# Altium PCB controller.PcbDoc
Units mm, origin at the board's own origin, x right, y up, seen from the top; angles counter-clockwise.
Board outline 63 x 66 mm, 2 copper layers (Top Layer, Bottom Layer); 47 components, 38 nets, 232 pads, 122 vias.
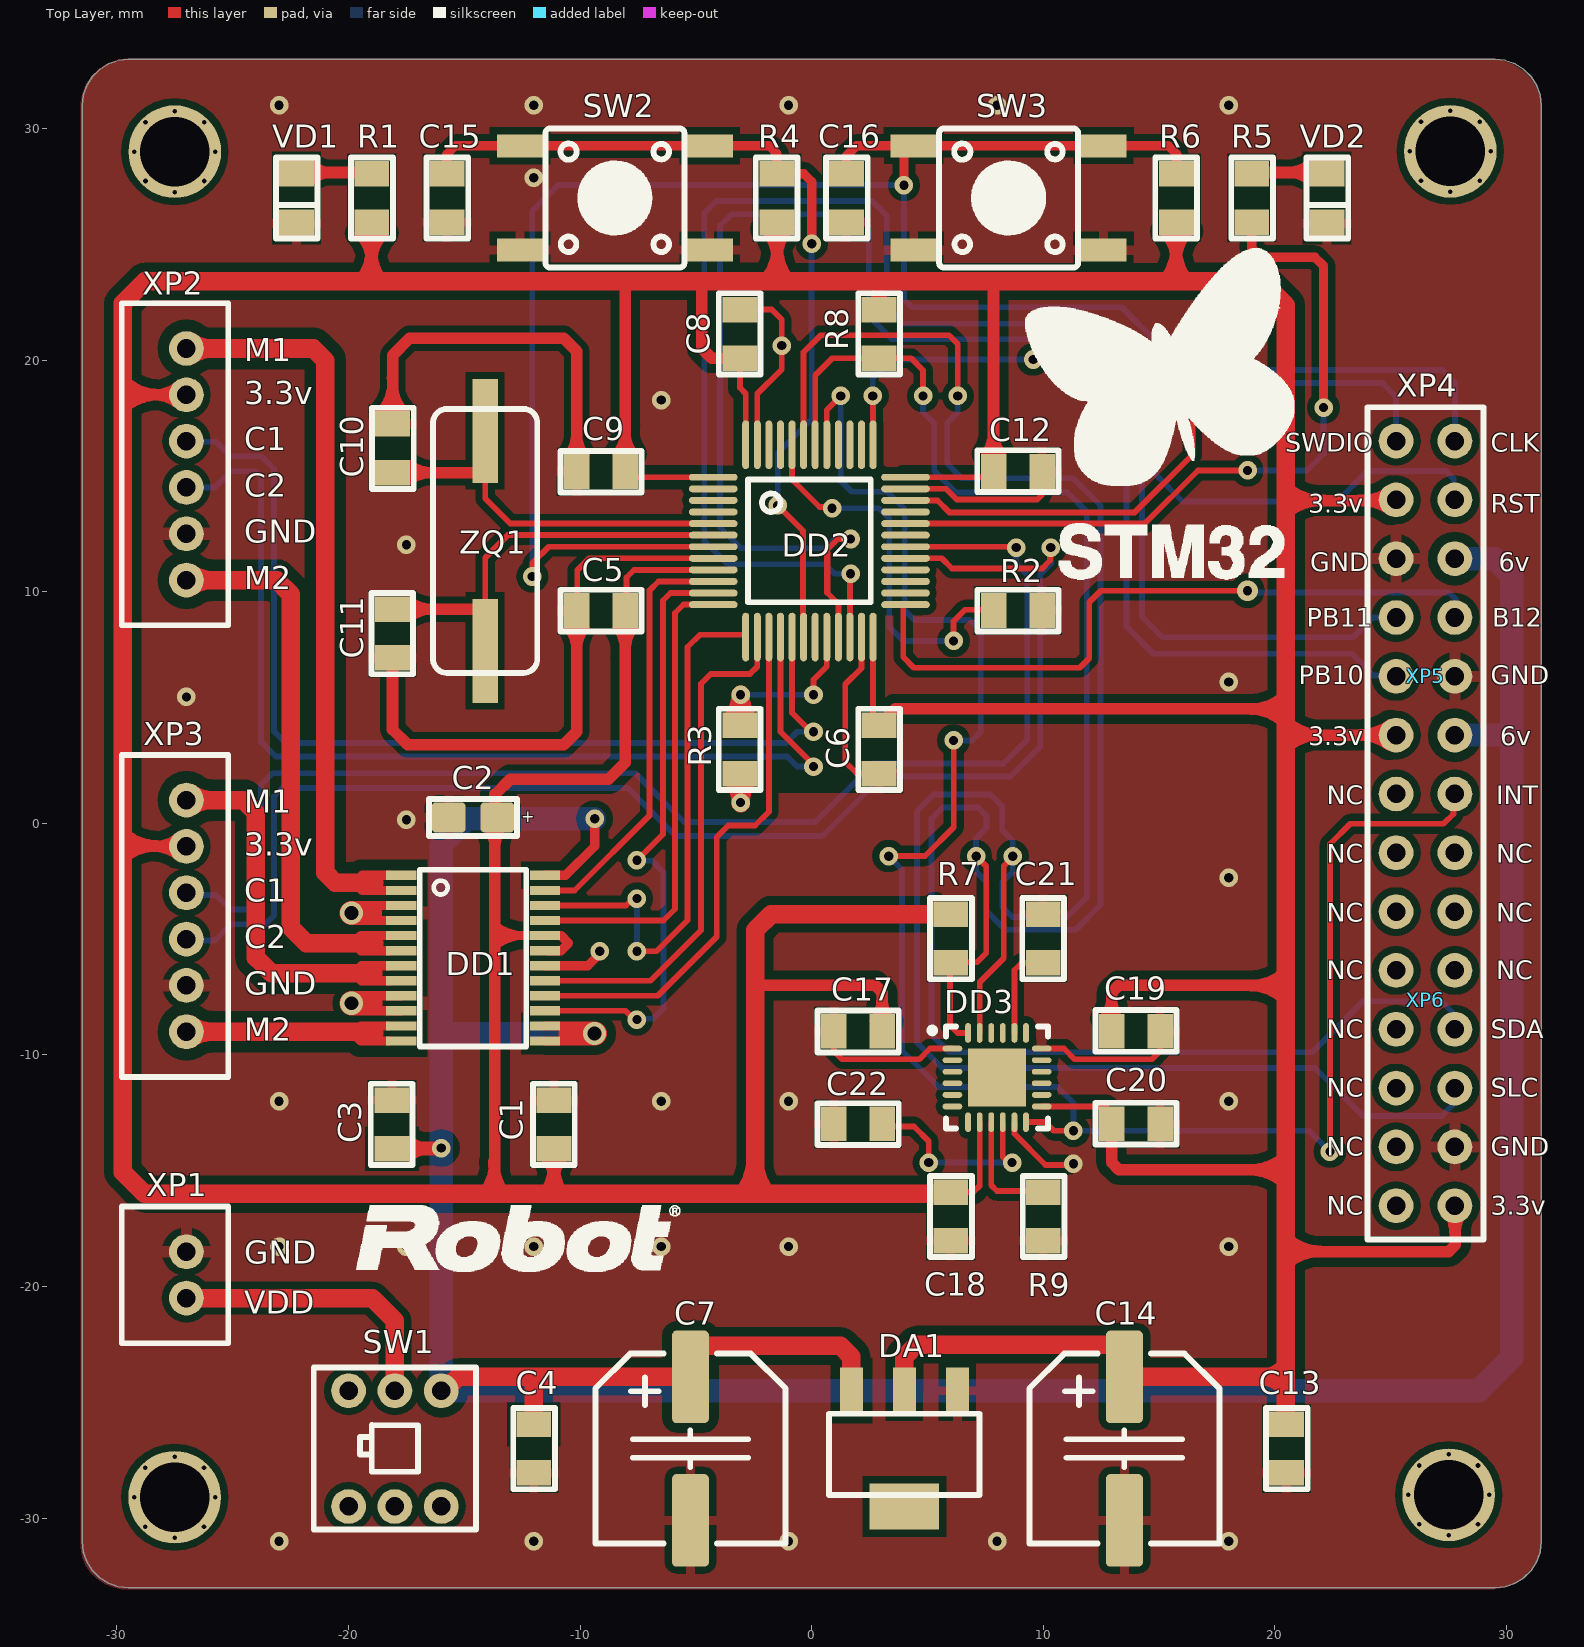
[diagram p0: Top Layer view]
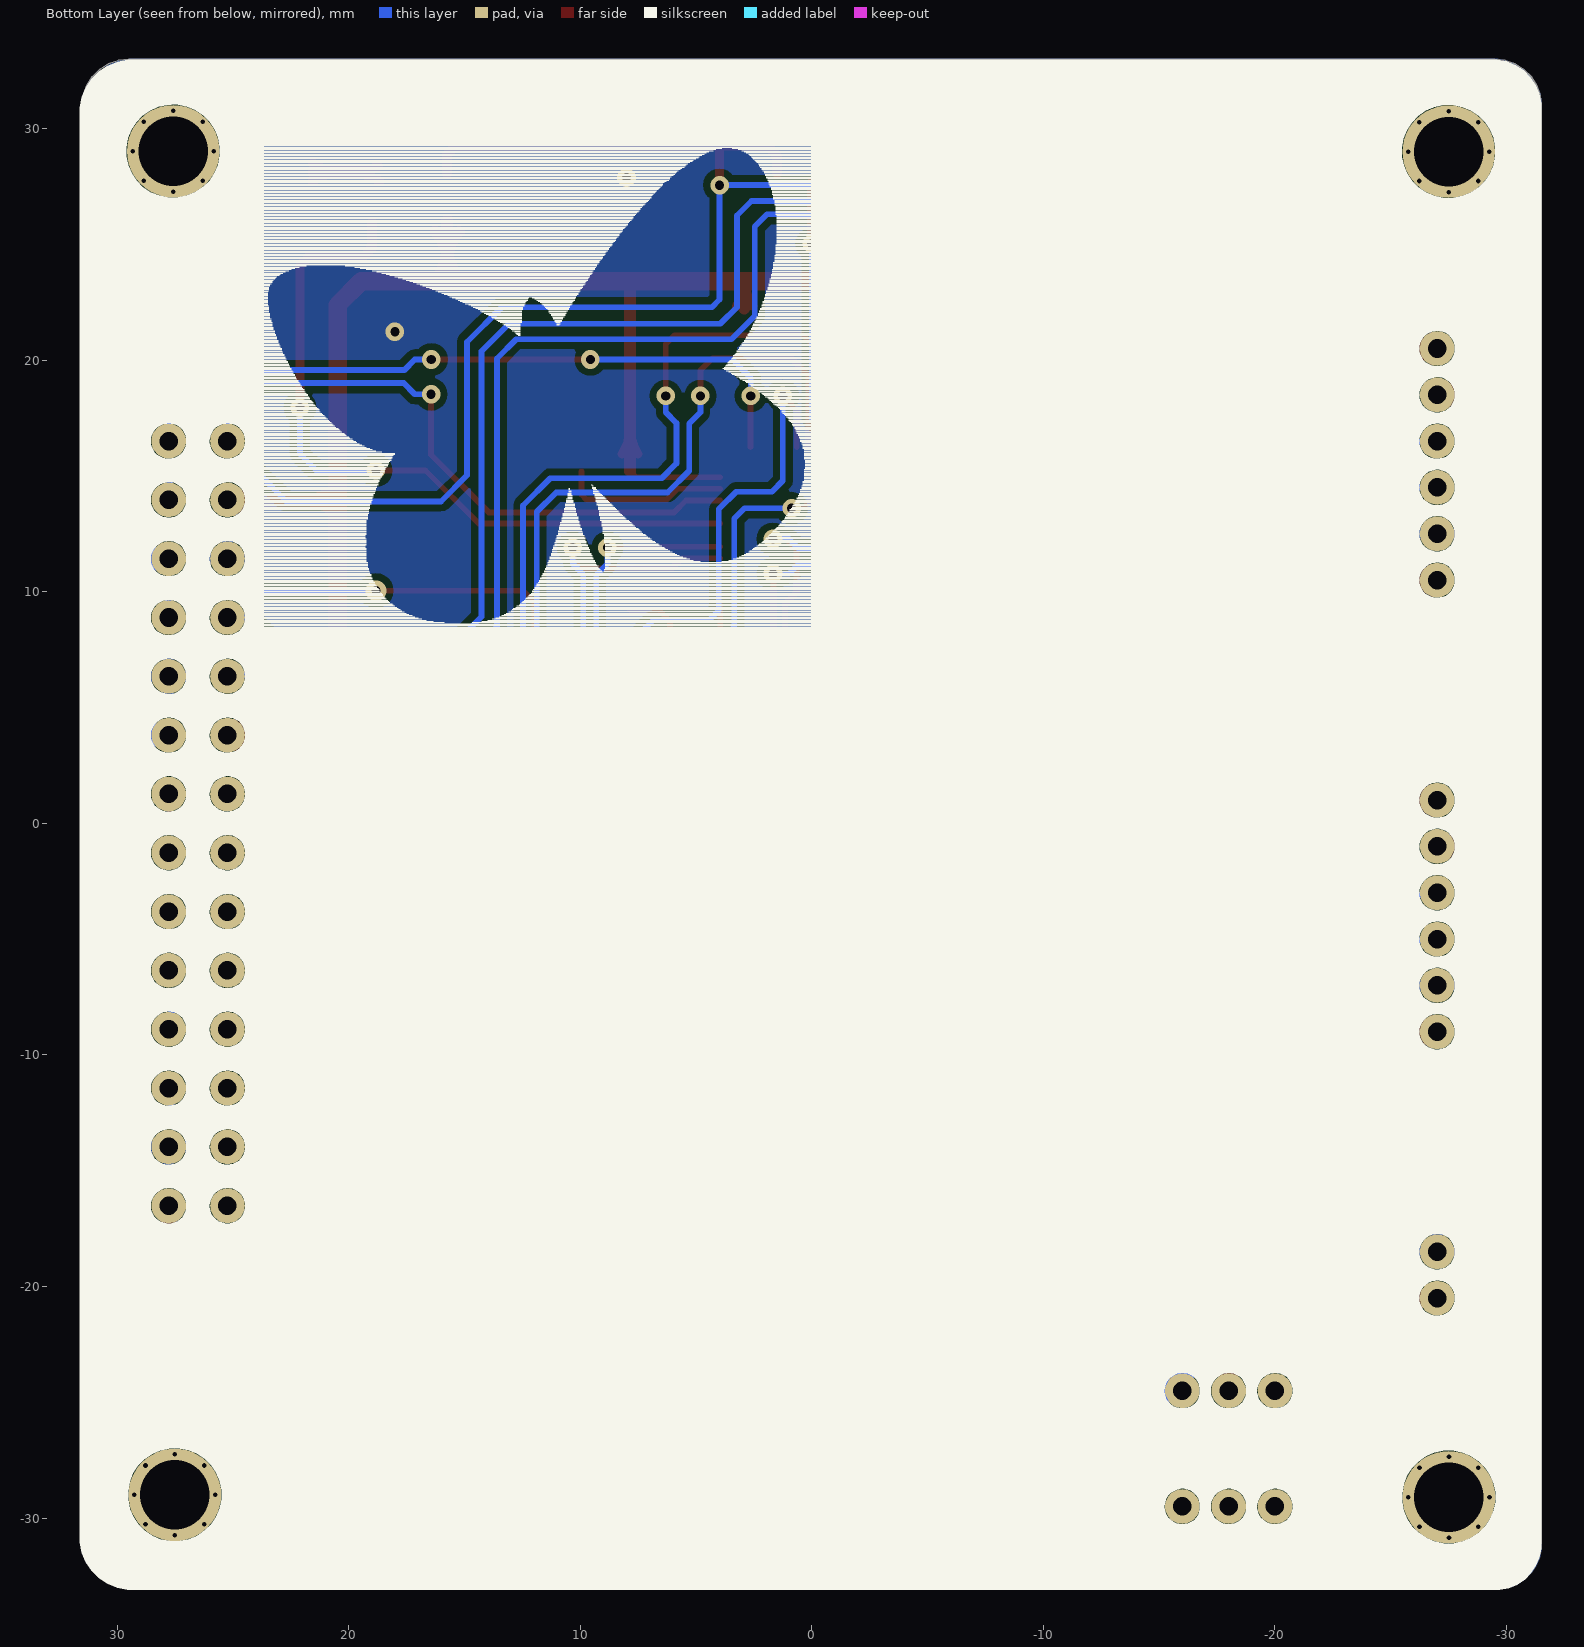
[diagram p1: Bottom Layer view, seen from below]

## Layer stack, top to bottom
Top Solder: solder mask 0.0102, Solder Resist, Dk 3.5
Top Layer: signal copper 0.0356
Dielectric 1: dielectric 0.32, FR-4, Dk 4.8
Bottom Layer: signal copper 0.0356
Bottom Solder: solder mask 0.0102, Solder Resist, Dk 3.5

## Board outline
-31.5,30.987 -31.5,-31.013 -31.45,-31.458 -31.302,-31.881 -31.064,-32.26 -30.747,-32.577 -30.368,-32.815 -29.945,-32.963 -29.5,-33.013 29.5,-33.013 29.945,-32.963 30.368,-32.815 30.747,-32.577 31.064,-32.26 31.302,-31.881 31.45,-31.458 31.5,-31.013 31.5,30.987 31.45,31.432 31.302,31.854 31.064,32.234 30.747,32.55 30.368,32.789 29.945,32.936 29.5,32.987 -29.5,32.987 -29.945,32.936 -30.368,32.789 -30.747,32.55 -31.064,32.234 -31.302,31.854 -31.45,31.432

## Design rules (kind name [scope] priority, off if disabled: settings)
Clearance Clearance_3 [InNet('NetDD1_1') OR InNet('NetDD1_5') OR InNet('NetDD1_7') OR InNet('NetDD1_11')] p1: gap=0.2 ignorepadtopadclearanceinfootprint=FALSE except(0.5: Arc-Fill Arc-Poly Arc-Region Track-Fill Track-Poly Track-Region SMDPad-Fill SMDPad-Poly SMDPad-Region THPad-Fill THPad-Poly THPad-Region Via-Fill Via-Poly Via-Region Fill-Fill Fill-Poly Fill-Region Poly-Poly Poly-Region Region-Region)
Clearance Clearance_2 [All vs InNet('+6')] p2: gap=0.2 ignorepadtopadclearanceinfootprint=FALSE except(0.4: Arc-Fill Arc-Poly Arc-Region Track-Fill Track-Poly Track-Region SMDPad-Fill SMDPad-Poly SMDPad-Region THPad-Fill THPad-Poly THPad-Region Via-Fill Via-Poly Via-Region)
Clearance Clearance_1 [InNet('+3.3')] p3: gap=0.2 ignorepadtopadclearanceinfootprint=FALSE except(0.3: SMDPad-Fill SMDPad-Poly SMDPad-Region THPad-Fill THPad-Poly THPad-Region Via-Fill Via-Poly Via-Region Fill-Fill Fill-Poly Fill-Region Poly-Poly Poly-Region Region-Region; 0.4: Arc-Fill Arc-Poly Arc-Region Track-Fill Track-Poly Track-Region)
Clearance [All] p4: gap=0.2 ignorepadtopadclearanceinfootprint=FALSE except(0.3: Arc-Fill Arc-Poly Arc-Region Track-Fill Track-Poly Track-Region SMDPad-Fill SMDPad-Poly SMDPad-Region THPad-Fill THPad-Poly THPad-Region Via-Fill Via-Poly Via-Region)
ComponentClearance ComponentClearance_1 [InComponent('XP4') AND InComponent('XP5') AND InComponent('XP6') vs InComponent('XP4') AND InComponent('XP5') AND InComponent('XP6')] p1: gap=-10 collisioncheckmode=3 verticalgap=-10 showdistances=FALSE
ComponentClearance [All] p2: gap=-3 collisioncheckmode=3 verticalgap=-3 showdistances=FALSE
DiffPairsRouting [All] p1: maxlimit=0.254 minlimit=0.25 mostfreqgap=0.254 toplayer_minwidth=0.3 toplayer_maxwidth=0.381 toplayer_prefwidth=0.381 bottomlayer_minwidth=0.3 bottomlayer_maxwidth=0.381 bottomlayer_prefwidth=0.381 maxuncoupledlength=12.7
PasteMaskExpansion [All] p1: expansion=0.05
PolygonConnect ConnectVia [InNetClass('via')] p1: thpad.connectstyle=Relief thpad.reliefconductorwidth=0.5 thpad.reliefentries=4 thpad.polygonreliefangle="90 Angle" thpad.airgapwidth=0.3 smdpad.connectstyle=Relief smdpad.reliefconductorwidth=0.4 smdpad.reliefentries=4 smdpad.polygonreliefangle="90 Angle" smdpad.airgapwidth=0.3 via.connectstyle=Direct via.reliefconductorwidth=0.254 via.reliefentries=4 via.polygonreliefangle="90 Angle" via.airgapwidth=0
PolygonConnect [All] p2: connectstyle=Relief reliefconductorwidth=0.5 reliefentries=4 polygonreliefangle="90 Angle" airgapwidth=0.3
RoutingCorners [All] p1: cornerstyle=45-Degree minsetback=0.5 maxsetback=0.5
RoutingVias [All] p1: holewidth=0.4 width=0.9 viastyle="Through Hole" minholewidth=0.4 minwidth=0.8 maxholewidth=0.9 maxwidth=1.5
SolderMaskExpansion [All] p1: expansion=0
Width [All] p1: maxlimit=1.2 minlimit=0.25 preferedwidth=0.3
26 further rules are at their usual default settings.

## Classes and differential pairs
net class via: GND

## Components (designator, comment, footprint, x,y, rotation, side; value= is the part's Value field where it differs from the comment)
C1 "CAPASITOR" CAP0805 -11.125,-13 r90 top value=100nF
C2 "2.2u" CAPMP2012X150USR -14.625,0.251 r180 top
C3 "CAPASITOR" CAP0805 -18.125,-13 r90 top value=100nF
C4 "CAPASITOR" CAP0805 -12,-27 r270 top value=100nF
C5 "CAPASITOR" CAP0805 -9.101,9.191 r180 top value=100nF
C6 "CAPASITOR" CAP0805 2.899,3.191 r270 top value=100nF
C7 "220u" CAP_ELEC_SIZE_E -5.238,-27 r180 top locked
C8 "CAPASITOR" CAP0805 -3.101,21.129 r90 top value=100nF
C9 "CAPASITOR" CAP0805 -9.101,15.191 r180 top value=100nF
C10 "CAPASITOR" CAP0805 -18.101,16.191 r270 top value=22pF
C11 "CAPASITOR" CAP0805 -18.101,8.191 r90 top value=22pF
C12 "CAPASITOR" CAP0805 8.899,15.191 r0 top value=100nF
C13 "CAPASITOR" CAP0805 20.5,-27 r270 top value=100nF
C14 "220u" CAP_ELEC_SIZE_E 13.5,-27 r180 top locked
C15 "CAPASITOR" CAP0805 -15.75,27 r270 top value=100nF
C16 "CAPASITOR" CAP0805 1.5,27 r270 top value=100nF
C17 "CAPASITOR" CAP0805 2,-8.978 r180 top value=100nF
C18 "CAPASITOR" CAP0805 6,-16.978 r270 top value=10uF
C19 "CAPASITOR" CAP0805 14,-8.978 r0 top value=10nF
C20 "CAPASITOR" CAP0805 14,-12.978 r0 top value=100n
C21 "CAPASITOR" CAP0805 10,-4.978 r90 top value=100nF
C22 "CAPASITOR" CAP0805 2,-12.978 r180 top value=100nF
DA1 "AMS1117" SOT-223 4,-27 r180 top locked
DD1 "TB6612FNG" SSOP24 -14.625,-5.824 r0 top
DD2 "STM32F103C8T6" LQFP48_M -0.101,12.191 r0 top
DD3 "MPU6050" QFN24 8,-10.978 r0 top
R1 "RESISTOR" RES0805 -19,27 r270 top value=4.7k
R2 "RESISTOR" RES0805 8.899,9.191 r180 top value=4.7k
R3 "RESISTOR" RES0805 -3.101,3.191 r90 top value=4.7k
R4 "RESISTOR" RES0805 -1.5,27 r90 top value=4.7k
R5 "RESISTOR" RES0805 19,27 r270 top value=4.7k
R6 "RESISTOR" RES0805 15.75,27 r90 top value=4.7k
R7 "RESISTOR" RES0805 6,-4.978 r270 top value=4.7k
R8 "RESISTOR" RES0805 2.899,21.129 r270 top value=4.7k
R9 "RESISTOR" RES0805 10,-16.978 r270 top value=4.7k
SW1 "PS700L" PS700L -18,-27 r0 top locked
SW2 "SWITCH" KLS76x6x4.3 -8.5,27 r0 top
SW3 "SWITCH" KLS76x6x4.3 8.5,27 r0 top
VD1 "RED" LED0805 -22.25,27 r270 top
VD2 "RED" LED0805 22.25,27 r270 top
XP1 "PH2.0-2P" PH2.0-2P -27,-19.5 r90 top locked
XP2 "PH2.0-6P" PH2.0-6P -27,15.5 r90 top
XP3 "PH2.0-6P" PH2.0-6P -27,-4 r90 top locked
XP4 "PLS-2-3" PBD2-3 26.5,13.965 r90 top
XP5 "PLS-2-3_1" PBD2-3 26.5,6.345 r90 top
XP6 "MPU6050" PBD2-16 26.5,-7.625 r90 top
ZQ1 "8MHz" HC-49SM -14.101,12.191 r270 top

## Footprints (in the part's own frame and the unit in brackets; to place one, negate y for a bottom-side part, rotate by r counter-clockwise, add the part's x,y. Pads: shape width x height; smd on the part's side, far side on the other; paste and mask are expansions set on the pad)
CAP0805 [mm]
  rect 1.1x1.5 smd: 1(1.05,0) 2(-1.05,0)
  Top Layer pour cut-out: 0.5,1.05 0.5,-1.05 -0.5,-1.05 -0.5,1.05
  silkscreen extent -1.75,-0.89 1.75,0.91, body extent -1,-0.63 1,0.64, height 0.57
CAP_ELEC_SIZE_E [mm] "Capacitor, polarized, aluminum can; 8.0x6.2mm DxH"
  round 0.635 on Mech15: 0(0,0)
  rrect25% 1.6x4 smd: 1(0,-3.1) 2(0,3.1)
  silkscreen extent -4.1,-4.1 4.1,4.1, body extent -4.25,-4.75 4.25,4.75, height 6.5
CAPMP2012X150USR [mm] "Molded body capacitor, Body 2.0x1.2mm, 0805, IPC Medium Density"
  round 0.254 on Mech15: 0(0,0)
  rrect25% 1.45x1.3 smd: 1(-1.05,0) 2(1.05,0)
  Top Layer pour cut-out: -0.4,0.8 0.4,0.8 0.4,-0.8 -0.4,-0.8
  silkscreen extent -1.9,-0.8 1.9,0.8, body extent -1.02,-0.67 1.03,0.68, height 1.5
HC-49SM [mm]
  rect 4.5x1.1 smd: 1(-4.75,0) 2(4.75,0)
  silkscreen extent -5.7,-2.25 5.7,2.25, body extent -6.2,-2.35 6.2,2.35, height 3.9
KLS76x6x4.3 [mm]
  rect 2x1 smd: 1(-4.1,2.25) 1(4.1,2.25) 2(-4.1,-2.25) 2(4.1,-2.25)
  silkscreen extent -3,-3 3,3, body extent -4.5,-3 4.5,3, height 4.3
LED0805 [mm]
  rect 1.2x1.5 smd: 1(-1.1,0) 2(1.1,0)
  Top Layer pour cut-out: 0.5,1.05 0.5,-1.05 -0.5,-1.05 -0.5,1.05
  silkscreen extent -1.75,-0.89 1.75,0.91, body extent -1.05,-0.67 1.05,0.68, height 0.9
LQFP48_M [mm] "QFP, 48-Leads, Body 7x7mm, Pitch 0.5mm, IPC Low Density"
  oval 2.1x0.3 smd: 1(-4.15,2.75) 2(-4.15,2.25) 3(-4.15,1.75) 4(-4.15,1.25) 5(-4.15,0.75) 6(-4.15,0.25) 7(-4.15,-0.25) 8(-4.15,-0.75) 9(-4.15,-1.25) 10(-4.15,-1.75) 11(-4.15,-2.25) 12(-4.15,-2.75) 25(4.15,-2.75) 26(4.15,-2.25) 27(4.15,-1.75) 28(4.15,-1.25) 29(4.15,-0.75) 30(4.15,-0.25) 31(4.15,0.25) 32(4.15,0.75) 33(4.15,1.25) 34(4.15,1.75) 35(4.15,2.25) 36(4.15,2.75)
  oval 0.3x2.1 smd: 13(-2.75,-4.15) 14(-2.25,-4.15) 15(-1.75,-4.15) 16(-1.25,-4.15) 17(-0.75,-4.15) 18(-0.25,-4.15) 19(0.25,-4.15) 20(0.75,-4.15) 21(1.25,-4.15) 22(1.75,-4.15) 23(2.25,-4.15) 24(2.75,-4.15) 37(2.75,4.15) 38(2.25,4.15) 39(1.75,4.15) 40(1.25,4.15) 41(0.75,4.15) 42(0.25,4.15) 43(-0.25,4.15) 44(-0.75,4.15) 45(-1.25,4.15) 46(-1.75,4.15) 47(-2.25,4.15) 48(-2.75,4.15)
  silkscreen extent -2.65,-2.65 2.65,2.65, body extent -4.49,-4.49 4.49,4.49, height 1.6
PBD2-3 [mm]
  round 1.5 hole 0.8: 1(-2.54,-1.27) 2(-2.54,1.27) 3(0,-1.27) 4(0,1.27) 5(2.54,-1.27) 6(2.54,1.27)
  silkscreen extent -4,-2.5 4,2.5, body extent -4.06,-2.54 4.06,2.54, height 8.5
PBD2-16 [mm]
  round 1.5 hole 0.8: 1(-8.89,-1.27) 2(-6.35,-1.27) 3(-3.81,-1.27) 4(-1.27,-1.27) 5(1.27,-1.27) 6(3.81,-1.27) 7(6.35,-1.27) 8(8.89,-1.27) 9(-8.89,1.27) 10(-6.35,1.27) 11(-3.81,1.27) 12(-1.27,1.27) 13(1.27,1.27) 14(3.81,1.27) 15(6.35,1.27) 16(8.89,1.27)
  silkscreen extent -10.35,-2.5 10.35,2.5, body extent -10.09,-2.52 10.23,2.48, height 8.4
PH2.0-2P [mm]
  round 1.5 hole 0.8: 1(-1,0) 2(1,0)
  silkscreen extent -2.95,-1.81 2.95,2.79, body extent -2.82,-1.74 3.08,2.76, height 6
PH2.0-6P [mm]
  round 1.5 hole 0.8: 1(-5,0) 2(-3,0) 3(-1,0) 4(1,0) 5(3,0) 6(5,0)
  silkscreen extent -6.95,-1.81 6.95,2.79, body extent -6.95,-1.76 6.95,2.74, height 6
PS700L [mm]
  round 1.5 hole 0.8: 1(-2,2.5) 2(0,2.5) 3(2,2.5) 4(-2,-2.5) 5(0,-2.5) 6(2,-2.5)
  silkscreen extent -3.5,-3.5 3.5,3.5, body extent -3.5,-3.5 3.5,3.5, height 12
QFN24 [mm] "QFN, 24-Leads, Body 4.00x4.00mm, Pitch 0.50mm, Thermal Pad 2.60x2.60mm, IPC Medium Density"
  oval 0.85x0.25 smd: 1(-1.925,1.25) 2(-1.925,0.75) 3(-1.925,0.25) 4(-1.925,-0.25) 5(-1.925,-0.75) 6(-1.925,-1.25) 13(1.925,-1.25) 14(1.925,-0.75) 15(1.925,-0.25) 16(1.925,0.25) 17(1.925,0.75) 18(1.925,1.25)
  oval 0.25x0.85 smd: 7(-1.25,-1.925) 8(-0.75,-1.925) 9(-0.25,-1.925) 10(0.25,-1.925) 11(0.75,-1.925) 12(1.25,-1.925) 19(1.25,1.925) 20(0.75,1.925) 21(0.25,1.925) 22(-0.25,1.925) 23(-0.75,1.925) 24(-1.25,1.925)
  rect 2.5x2.5 smd: 25(0,0)
  silkscreen extent -2.92,-2.2 2.2,2.2, body extent -2,-2.01 2.01,2, height 0.9
RES0805 [mm]
  rect 1.1x1.5 smd: 1(1.05,0) 2(-1.05,0)
  Top Layer pour cut-out: 0.5,1.05 0.5,-1.05 -0.5,-1.05 -0.5,1.05
  silkscreen extent -1.75,-0.89 1.75,0.91, body extent -1,-0.63 1,0.63, height 0.43
SOT-223 [mm]
  rect 3x2 smd: 0(0,2.5)
  rect 1x2 smd: 1(-2.29,-2.5) 2(0,-2.5) 3(2.29,-2.5)
  silkscreen extent -3.25,-1.5 3.25,2, body extent -3.25,-3.22 3.25,3.78, height 1.85
SSOP24 [mm]
  rect 1.3x0.4 smd: 1(-3.1,3.575) 2(-3.1,2.925) 3(-3.1,2.275) 4(-3.1,1.625) 5(-3.1,0.975) 6(-3.1,0.325) 7(-3.1,-0.325) 8(-3.1,-0.975) 9(-3.1,-1.625) 10(-3.1,-2.275) 11(-3.1,-2.925) 12(-3.1,-3.575) 13(3.1,-3.575) 14(3.1,-2.925) 15(3.1,-2.275) 16(3.1,-1.625) 17(3.1,-0.975) 18(3.1,-0.325) 19(3.1,0.325) 20(3.1,0.975) 21(3.1,1.625) 22(3.1,2.275) 23(3.1,2.925) 24(3.1,3.575)
  silkscreen extent -2.3,-3.81 2.3,3.82, body extent -3.27,-3.95 3.28,3.95, height 1.2

## Part data
C1 C3 C4 C5 C6 C8 C9 C10 C11 C12 C13 C15 C16 C17 C18 C19 C20 C21 C22: "CAP"
C2 C7 C14: library part CAPASITOR_POLAR, "CAP"
DA1: library part AMS1117-3.3
DD1: library part DRIVER-TB6612FNG-O/C8/EL(SSOP24)(ESKD), "Stepping Motor Driver Ic Unipolor Copper Wire 8", Package="SSOP-24 Toshiba", Availability=Unavailable, MF=Toshiba, MP=TB6612FNG_O,C,8,EL, Price=None, SnapEDA_Link=https://www.snapeda.com/parts/TB6612FNG%28O%2CC%2C8%2CEL/Toshiba/view-part/?ref=snap
DD2: I/Os (High Current)=37, Operating Frequency(F) (Processor speed) (MHz)=72, Supplier Part Number 1=497-6063-ND, Supply Voltage(Vcc) min (V)=2, A/D Converter="2x12-bit (10 Channel)", ComponentLink1Description="Manufacturer URL", ComponentLink1URL=http://www.st.com/web/en/home.html, ComponentLink2Description=Datasheet, ComponentLink2URL=http://www.st.com/st-web-ui/static/active/en/resource/technical/document/datasheet/CD00161566.pdf, ComponentLink3Description="Package Specification", ComponentLink3URL=http://www.st.com/st-web-ui/static/active/en/resource/technical/document/datasheet/DM00058181.pdf, Core="ARM Cortex-M3", DatasheetVersion="Rev. 16", FLASH Size (Prog) (kB)=64, Internal RAM Size (kB)=20, Mounting Technology="Surface Mount", PackageDescription="48-Pin Low Profile Quad Flat Package, 7 x 7 mm Body, 0.5 mm Pitch", PackageReference=LQFP48, PackageVersion="Rev. 6, 06/2013", Packing=Tray, PartNumber=STM32F103C8T6, Supplier 1=Digi-Key, Supplier 2=Farnell, Supplier 3=Newark, Supplier 4=Newark, Supplier 5=Mouser, Supplier Part Number 2=1447637, Supplier Part Number 3=59M2182, Supplier Part Number 4=57P1222, Supplier Part Number 5=511-STM32F103C8T6
DD3: library part MPU6050(ESKD)
R1 R2 R3 R4 R5 R6 R7 R8 R9: "*"
VD1 VD2: library part diode_led
XP6: library part PBD-1-8
ZQ1: library part HC-49
SW1: ComponentLink1Description=datasheet, ComponentLink1URL=https://static.chipdip.ru/lib/054/DOC000054735.pdf
SW2 SW3: ComponentLink1Description=AliExpress, ComponentLink1URL=https://ru.aliexpress.com/item/10PCS-4-4-1-6mm-4x4x1-6H-SMD-push-button-switch-microswitch-Tact-Switch/32731081870.html?spm=a2g0s.9042311.0.0.250233edGDnBBV
XP1 XP2 XP3 XP4 XP5: ComponentLink1Description=PH2.0-6P, ComponentLink1URL=https://ru.aliexpress.com/item/PH2-0-Pin-2-0/32959003108.html?spm=a2g0s.13010208.99999999.267.6b9d3c00Fzf6qQ

## Free pads (board coordinates)
  round 4 hole 3: 0(-27.511,-29.099) 0(-27.5,29) 0(27.5,-29) 0(27.574,29.013)

## Via types
v1: diameter 0.8, hole 0.4, Top Layer to Bottom Layer, tented both sides, 70 vias
v2: diameter 0.3, hole 0.2, Top Layer to Bottom Layer, 48 vias
v3: diameter 1, hole 0.6, Top Layer to Bottom Layer, tented both sides, 3 vias
v4: diameter 0.9, hole 0.4, Top Layer to Bottom Layer, tented both sides, 1 vias

## Nets (pads, with @x,y where several pads share a name; then routed paths per layer and width w, separated by ;. In a path a pad name is that pad's centre, name@x,y a point inside that pad or via, vN(x,y) a via of type N, cw(c..) or ccw(c..) an arc to the next point about the centre after c; other vN are vias at no path point)
+3.3: C1.2 C2.1 C5.2 C6.2 C8.2 C9.2 C12.2 C13.2 C14.1 C17.2 C18.2 C19.2 C20.2 DA1.2 DD1.19 DD1.20 DD2.1 DD2.9 DD2.24 DD2.36 DD2.48 DD3.8 DD3.13 R1.1 R4.2 R6.2 R7.2 R8.2 XP2.5 XP3.5 XP4.4 XP5.2 XP6.1 | length 463.6
  Top Layer w0.25: -18.025,23.426 -18,23.4 ; C1.2 -11.125,-14.908 -11.125,-15.875 -11,-16 ; -8.054,23.4 -8.051,23.397 ; C5.2@-8.051,9.191 -8,9.242 -8,10.617 -7.676,10.941 DD2.9@-4.151,10.941 ; C9.2 -7.801,14.941 DD2.1@-4.151,14.941 ; C8.2 -3.101,18.801 -2.851,18.551 DD2.48@-2.851,16.241 ; -2,23.4 -1.975,23.426 ; DD2.24@2.649,8.141 2.649,4.491 C6.2 ; R8.2@2.874,22.179 R8.2@2.914,22.22 ; DD2.36@3.949,14.941 7.599,14.941 C12.2 ; C18.2 6.007,-15.921 6.978,-15.921 7.25,-15.649 DD3.8 ; 7.849,23.249 8,23.4 ; DD3.13 12.705,-12.228 12.95,-12.473 C20.2 ; 14.5,23.4 14.525,23.426 ; 20.477,-19.85 20.486,-19.86 ; 20.477,3.7 20.582,3.805 ; 20.477,11.225 20.677,11.425
  Top Layer w0.4: -28.683,-1.052 cw(c-28.442,-2.78) XP3.5@-27.443,-1.349 ; -28.683,-0.951 ccw(c-28.429,0.739) -28.437,-0.97 ccw(c-28.429,0.739) XP3.5@-27.441,-0.656 ; -28.683,18.448 cw(c-28.442,16.72) XP2.5@-27.443,18.151 ; -28.683,18.549 ccw(c-28.429,20.239) -28.518,18.532 ccw(c-28.429,20.239) XP2.5@-27.441,18.844 ; C2.1@-14.028,-0.13 cw(c-15.423,-1.118) -13.732,-1.371 ; -13.679,-4.849 -12.662,-4.849 ; -13.654,-5.257 cw(c-12.34,-7.042) -12.662,-4.849 ; -13.654,-4.44 ccw(c-12.34,-2.656) -12.662,-4.849 ; -13.632,-1.371 cw(c-11.904,-1.13) C2.1@-13.334,-0.132 ; -12.397,-4.849 -10.825,-4.849 -10.5,-5.174 -10.825,-5.499 DD1.19@-11.4,-5.499 ; DD1.20 -12.662,-4.849 ; C1.2@-11.48,-14.508 cw(c-12.875,-15.495) -11.189,-15.216 cw(c-12.875,-15.495) -11.185,-15.749 ; -11.084,-15.749 cw(c-9.356,-15.508) -11.078,-15.229 cw(c-9.356,-15.508) C1.2@-10.787,-14.509 ; -8.399,15.946 ccw(c-9.829,16.944) -8.102,17.185 ; -8.397,8.438 cw(c-9.792,7.451) -8.102,7.197 ; -8.001,7.197 cw(c-6.273,7.438) -7.704,8.437 ; -8.001,17.185 ccw(c-6.311,16.931) -7.706,15.944 ; -3.074,-15.832 ccw(c-4.858,-14.517) -2.665,-14.839 ; -2.256,-14.815 ccw(c-0.063,-14.493) -1.847,-15.808 ; R8.2@2.55,22.331 ccw(c1.12,23.329) 2.863,23.4 ccw(c1.12,23.329) 2.848,23.57 ; C17.2@2.7,-8.527 ccw(c1.249,-7.558) 2.977,-7.317 ; 2.948,23.57 ccw(c4.639,23.316) 2.932,23.4 ccw(c4.639,23.316) R8.2@3.244,22.329 ; 3.078,-7.309 ccw(c5.186,-7.471) C17.2@3.373,-8.558 ; 4.085,-3.969 cw(c4.326,-5.697) R7.2@5.324,-4.267 ; 4.085,-3.869 ccw(c4.339,-2.178) R7.2@5.326,-3.573 ; 7.501,15.946 ccw(c6.071,16.944) 7.798,17.185 ; 7.899,17.185 ccw(c9.589,16.931) 8.194,15.944
  Top Layer w0.45: R1.1@-19.518,25.477 cw(c-21.064,24.128) -19.039,24.458 ; -18.979,24.377 cw(c-16.942,24.136) R1.1@-18.477,25.496 ; R4.2@-2.02,25.665 cw(c-3.565,24.316) -1.521,24.486 cw(c-3.565,24.316) -1.515,24.235 ; -1.493,24.246 cw(c0.557,24.324) -1.471,24.633 cw(c0.557,24.324) R4.2@-0.979,25.685 ; R6.2@15.222,25.55 cw(c13.676,24.201) 15.707,24.493 ; 15.765,24.486 cw(c17.798,24.209) R6.2@16.263,25.57
  Top Layer w0.5: -29.744,-1 -28.609,-1 ; -29.744,18.5 -28.387,18.5 ; -29.602,-1.408 cw(c-28.287,-3.193) -28.609,-1 ; -29.555,-0.547 ccw(c-28.24,1.237) -28.437,-0.97 ccw(c-28.24,1.237) -28.312,-0.978 ; -29.53,18.075 cw(c-28.215,16.29) -28.387,18.5 ; -29.483,18.936 ccw(c-28.168,20.721) -28.518,18.532 ccw(c-28.168,20.721) -28.24,18.506 ; -28.359,-0.978 ccw(c-28.287,-3.193) -28.609,-1 ; -28.287,18.506 ccw(c-28.215,16.29) -28.387,18.5 ; XP3.5 -28.609,-1 ; XP2.5 -28.387,18.5 ; -19.443,23.497 ccw(c-21.227,24.811) -19.039,24.458 ccw(c-21.227,24.811) -19.012,24.74 ; -19,24.522 R1.1 ; -18.979,24.377 ccw(c-16.797,24.764) -18.581,23.45 ; -14.102,-15.921 ccw(c-15.899,-14.623) -13.706,-14.942 ; -13.724,-14.603 ccw(c-11.508,-14.652) -13.706,-14.942 ; -13.683,-14.601 cw(c-15.899,-14.623) -13.706,-14.942 ; -13.679,-16 -13.679,-15.1 ; -13.679,-5.574 -13.679,-7 ; -13.338,-15.903 cw(c-11.508,-14.652) -13.679,-15.1 ; -11.56,-16.017 ccw(c-13.345,-14.702) -11.548,-16 ccw(c-13.345,-14.702) -11.189,-15.216 ccw(c-13.345,-14.702) -11.13,-14.774 ; -11.13,-14.821 ccw(c-8.914,-14.749) -11.125,-14.908 ccw(c-8.914,-14.749) -11.078,-15.229 ccw(c-8.914,-14.749) -10.744,-16 ccw(c-8.914,-14.749) -10.699,-16.064 ; C5.2 -8.051,2.624 -8.775,1.9 -13.025,1.9 -13.679,1.246 -13.679,-4.849 -13.679,-7 ; C9.2 -8.051,23.397 ; -4.75,23.4 -4.75,20.509 -4.32,20.079 C8.2 ; -2.449,-7 2.74,-7 3.05,-7.31 C17.2 ; -1.913,23.591 ccw(c-3.697,24.905) -1.521,24.486 ccw(c-3.697,24.905) -1.501,24.604 ; -1.557,23.4 ccw(c0.26,24.669) -1.525,23.355 ; -1.501,23.614 -1.501,24.604 ; R4.2@-1.501,26.139 -1.501,24.604 ; -1.482,24.786 ccw(c0.733,24.858) -1.471,24.633 ccw(c0.733,24.858) -1.084,23.589 ; -1.482,24.833 cw(c-3.697,24.905) -1.501,24.604 ; C6.2 3.599,4.941 19.12,4.941 ; R8.2@2.914,22.22 2.914,23.4 ; C12.2 7.849,23.249 ; C19.2@12.652,-8.421 ccw(c11.237,-7.401) 12.947,-7.742 ; C20.2 12.95,-14.646 13.26,-14.956 19.12,-14.956 ; C19.2 12.95,-7.31 13.26,-7 19.12,-7 ; 12.957,-7.734 ccw(c14.66,-7.581) C19.2@13.227,-8.512 ; 15.309,23.564 ccw(c13.524,24.878) 15.707,24.493 ; 15.74,23.499 R6.2@15.74,26.024 ; 15.765,24.486 ccw(c17.955,24.831) 16.17,23.517 ; 18.972,-23.906 cw(c18.901,-26.121) 20.215,-24.336 ; 18.972,-14.962 cw(c18.901,-17.177) 20.215,-15.393 ; 18.972,-7.006 cw(c18.901,-9.221) 20.215,-7.436 ; 18.972,4.935 cw(c18.901,2.72) 20.215,4.505 ; 19.02,-23.906 ccw(c18.948,-21.69) 19.12,-23.9 ccw(c18.948,-21.69) 20.263,-23.475 ; 19.02,-14.962 ccw(c18.948,-12.747) 19.12,-14.956 ; 19.02,-7.006 ccw(c18.948,-4.79) 19.12,-7 ; 19.02,4.935 ccw(c18.948,7.151) 19.12,4.941 ; 20.263,-14.531 cw(c18.948,-12.747) 19.12,-14.956 ; 20.263,-6.575 cw(c18.948,-4.79) 19.12,-7 ; 20.263,5.366 cw(c18.948,7.151) 19.12,4.941 ; 20.43,13.935 20.477,13.935 21.523,13.935 ; 20.477,-14.956 19.12,-14.956 ; 20.477,-7 19.12,-7 ; 20.477,4.941 19.12,4.941 ; 20.582,3.805 21.725,3.805 ; 20.633,3.384 cw(c21.947,1.6) 21.725,3.805 ; 20.65,-18.918 cw(c21.964,-20.702) 21.782,-18.493 ; 20.665,14.381 ccw(c22.022,16.223) 21.699,13.958 ccw(c22.022,16.223) 21.948,13.936 ; 20.669,13.508 cw(c21.983,11.724) 22.126,13.936 ; 20.68,4.246 ccw(c21.994,6.03) 21.923,3.815 ; 20.697,-18.056 ccw(c22.012,-16.272) 21.94,-18.487 ; 20.743,-18.493 21.782,-18.493 ; 21.876,3.815 ccw(c21.947,1.6) 21.725,3.805 ; 21.893,-18.487 ccw(c21.964,-20.702) 21.782,-18.493 ; 22.022,13.935 24.01,13.935 ; 23.639,13.936 24.004,13.936 ; 23.682,3.816 cw(c23.61,1.601) 23.843,3.805 ; 23.729,3.816 ccw(c23.657,6.031) 23.829,3.822 ; 23.897,13.94 ccw(c23.725,16.149) XP4.4@25.039,14.365 ; 24.373,3.805 23.843,3.805 ; XP5.2@24.924,3.385 ccw(c23.61,1.601) 23.843,3.805 ; XP5.2@24.972,4.247 cw(c23.657,6.031) 23.829,3.822 ; XP4.4@24.981,13.53 ccw(c23.667,11.745) 24.01,13.935 ; XP4.4@24.996,13.936 24.004,13.936 ; XP5.2@25.186,3.822 23.829,3.822 ; XP4.4@25.23,13.935 24.01,13.935 ; XP6.1@27.347,-16.46 cw(c25.562,-17.774) 27.768,-17.563 cw(c25.562,-17.774) 27.777,-17.703 ; 27.777,-17.75 cw(c29.992,-17.821) 27.794,-17.539 ; XP6.1@27.794,-16.597 27.794,-17.539 ; XP6.1@28.208,-16.507 ccw(c29.992,-17.821) 27.794,-17.539 ; -13.706,-14.942 ccw(c-11.508,-14.652) -13.679,-15.1 ; -13.679,-15.1 -13.679,-7 ; 21.725,3.805 23.843,3.805 ; 21.782,-18.493 27.505,-18.493 27.794,-18.204 27.794,-17.539 ; 24.004,13.936 cw(c23.667,11.745) 24.01,13.935
  Top Layer w0.8: DA1.2 4,-23.032 4.522,-22.51 13.1,-22.51 13.5,-22.91 C14.1 19.12,-23.9 20.477,-23.9 ; R7.2@5.975,-3.928 -1.753,-3.928 -2.449,-4.624 -2.449,-7 -2.449,-16 ; C18.2@6,-16 -2.449,-16 ; 20.474,-18.541 20.477,-14.956 20.477,-7 20.477,3.7 20.477,4.941 20.477,11.225 20.477,13.935 20.477,22.377 19.453,23.4 14.5,23.4 8,23.4 2.932,23.4 2.914,23.4 2.863,23.4 -1.557,23.4 -2,23.4 -4.75,23.4 -8.054,23.4 -18,23.4 -28.793,23.4 -29.744,22.45 -29.744,18.5 -29.744,-1 -29.744,-15.063 -28.807,-16 -13.679,-16 -11.548,-16 -11,-16 -10.744,-16 -2.449,-16 ; 20.477,-17.925 20.477,-19.85 20.477,-23.9 ; C13.2 20.477,-25.95 20.477,-23.9
+6: C3.2 C4.2 C7.1 DA1.3 DD1.13 DD1.14 DD1.24 SW1.3 XP4.1 XP5.1 | length 158.7
  Top Layer w0.25: v1@-15.9,-14.05 v1@-15.875,-14.025
  Top Layer w0.4: -17.373,-14.396 cw(c-16.385,-15.791) v1@-16.131,-14.1 ; -17.371,-13.702 ccw(c-16.372,-12.272) v1@-16.131,-14 ; DD1.13 -10.313,-9.399 ; DD1.14 -10.313,-8.749 ; DD1.24 -10.635,-2.249 -9.375,-0.989 v1(-9.375,0.198)
  Top Layer w0.6: C3.2 v1@-15.9,-14.05
  Top Layer w0.8: SW1.3 -15.861,-24.5 -15.261,-23.9 -12,-23.9 ; C4.2 -12,-23.9 ; C7.1@-5.638,-23.032 -5.638,-22.51 -5.238,-22.91 C7.1 -12,-23.9 ; C7.1@-5.238,-22.564 1.241,-22.564 1.71,-23.032 DA1.3@1.71,-24 ; DA1.3@1.61,-23.9 DA1.3@1.71,-24 ; DA1.3@1.764,-24.554 DA1.3 DA1.3@1.71,-24
  Top Layer w1.05: -10.419,-9.075 v3(-9.375,-9.075)
  Bottom Layer w0.25: 30.145,3.805 30.225,3.725
  Bottom Layer w1: -15.875,-9.053 -15.853,-9.075 v3(-9.375,-9.075) ; v1(-9.375,0.198) -14.87,0.198 -16,-0.932 v1(-16,-14.025) SW1.3 28.8,-24.5 30.225,-23.075 30.225,3.725 30.225,10.687 29.487,11.425 XP4.1@28.27,11.425 ; XP5.1 30.145,3.805
GND: C1.1 C2.2 C3.1 C4.1 C5.1 C6.1 C7.2 C8.1 C9.1 C10.2 C11.2 C12.1 C13.1 C14.2 C15.1 C16.1 C17.1 C18.1 C19.1 C20.1 C21.1 C22.1 DA1.1 DD1.3 DD1.4 DD1.9 DD1.10 DD1.18 DD2.8 DD2.23 DD2.35 DD2.47 DD3.1 DD3.11 DD3.18 R2.2 R3.2 R9.1 SW2.2 SW3.2 VD1.2 VD2.2 XP1.2 XP2.2 XP3.2 XP4.2 XP5.3 XP6.2 | length 104.6
  Top Layer w0.2: C5.1@-10.151,9.191 C5.1@-10.125,9.217
  Top Layer w0.25: C5.1@-10.125,9.217 -10.125,10.926 -9.61,11.441 DD2.8 DD2.8@-4.151,11.441 ; C8.1 -1.73,22.179 -1.3,21.749 v1(-1.3,20.629) -1.3,19.596 -2.351,18.545 DD2.47 DD2.47@-2.351,16.241 ; v1(-3.076,0.893) -3.076,0.953 R3.2@-3.076,2.141 ; C17.1 0.95,-9.825 1.311,-10.186 4.65,-10.186 5.108,-9.728 DD3.1 ; DD2.23@2.149,8.141 DD2.23 2.149,6.699 1.45,6 1.45,2.65 1.932,2.168 2.872,2.168 C6.1 ; DD2.35@3.949,14.441 DD2.35 5.794,14.441 6.26,13.975 9.733,13.975 9.949,14.191 C12.1 ; DD3.11 8.75,-13.403 10.097,-14.75 v1@11.075,-14.75 ; DD3.18 10.892,-9.728 11.35,-10.186 14.689,-10.186 15.05,-9.825 C19.1
  Top Layer w0.4: -18.937,-8.099 DD1.10 ; -18.937,-7.449 DD1.9 ; -18.937,-4.199 DD1.4 ; -18.937,-3.549 DD1.3 ; C10.2@-18.653,17.753 ccw(c-19.879,18.994) -18.151,19.235 ; -18.05,19.235 ccw(c-16.36,18.981) C10.2@-17.549,17.753 ; DD1.18 -9.671,-6.149 -9.2,-5.678 -9.2,-5.475 v1@-9.15,-5.425 ; C9.1@-10.498,15.895 ccw(c-11.929,16.893) -10.201,17.134 ; -10.497,8.439 cw(c-11.892,7.451) -10.202,7.197 ; -10.101,7.197 cw(c-8.373,7.438) -9.804,8.437 ; -10.1,17.134 ccw(c-8.41,16.881) C9.1@-9.805,15.893 ; R3.2@-3.414,1.935 cw(c-4.809,0.948) -3.365,1.863 cw(c-4.809,0.948) v1@-3.119,0.694 ; v1@-3.018,0.694 cw(c-1.29,0.935) -2.868,1.679 cw(c-1.29,0.935) R3.2@-2.721,1.933
  Top Layer w0.5: C11.2 -18.101,4.049 -17.444,3.391 -10.709,3.391 -10.151,3.949 C5.1@-10.151,9.191 ; C10.2@-18.101,17.191 -18.101,19.954 -18.095,19.96 -18.095,20.215 -17.37,20.941 -10.709,20.941 -10.151,20.383 C9.1@-10.151,15.141
  Top Layer w0.6: C10.2@-18.095,17.323 -18.095,18.143
  Top Layer w0.8: R3.2@-3.398,1.909 cw(c-4.784,0.91) -3.365,1.863 cw(c-4.784,0.91) -3.076,0.953 cw(c-4.784,0.91) v1@-3.075,0.897 ; R3.2@-2.78,1.825 ccw(c-1.331,0.853) -2.868,1.679 ccw(c-1.331,0.853) v1@-3.075,0.897 ; v1@-3.075,0.897 ccw(c-1.331,0.853) -3.076,0.867 ccw(c-4.784,0.91) v1@-3.075,0.897
  Top Layer w1.05: v3(-19.875,-7.773) -19.057,-7.773 ; v3(-19.875,-3.873) -19.085,-3.873
  other v1: -23,-31 -12,-31 -1,-31 8,-31 18,-31 -23,-18.278 -17.5,-18.278 -12,-18.278 -6.5,-18.278 -1,-18.278 18,-18.278 11.3,-14.7 -23,-12 -6.5,-12 -1,-12 18,-12 -9.15,-5.525 18,-2.35 -17.5,0.15 -27,5.455 18,6.1 -17.5,12.022 -6.5,18.275 18,21.225 -12,27.871 8,27.871 -23,31 -12,31 -1,31 8,31 18,31
INT: DD2.41 DD3.12 XP6.8 | length 82.1
  Top Layer w0.25: DD2.41@0.649,16.241 DD2.41 0.649,17.849 v1(1.25,18.45) ; v1(3.32,-1.419) 3.327,-1.412 4.886,-1.412 6.128,-0.17 v1@6.128,3.403 ; DD3.12 10.078,-12.903 10.45,-13.275 v1(11.3,-13.275) ; v1(22.375,-14.175) 22.375,-0.9 23.25,-0.025 27.282,-0.025 27.708,0.401 27.708,0.703 XP6.8@28.27,1.265
  Bottom Layer w0.25: v1(1.25,18.45) 1.25,14.787 1.723,14.314 3.264,14.314 4.013,13.565 4.013,9.192 4.423,8.783 6.84,8.783 7.3,8.322 7.3,3.956 6.921,3.577 v1(6.125,3.577) ; v1(3.32,-1.419) 3.902,-2.001 3.902,-9.814 5.479,-11.391 10.613,-11.391 11.3,-12.078 v1(11.3,-13.275) 21.475,-13.275 v1(22.375,-14.175)
NetC10_1: C10.1 DD2.5 ZQ1.1 | length 19.8
  Top Layer w0.25: ZQ1.1@-14.101,17.191 -14.101,16.838 -14.101,14.021 -13.021,12.941 DD2.5@-4.151,12.941
  Top Layer w0.4: -17.348,14.796 cw(c-16.361,13.401) -16.107,15.091 ; -17.347,15.489 ccw(c-16.348,16.919) -16.107,15.192
  Top Layer w0.5: C10.1 ZQ1.1@-14.526,15.141
NetC11_1: C11.1 DD2.6 ZQ1.2 | length 21.3
  Top Layer w0.25: ZQ1.2@-14.152,7.141 -14.101,7.191 -14.101,9.241 -14.101,11.465 -13.125,12.441 DD2.6@-4.151,12.441
  Top Layer w0.4: -17.349,8.895 cw(c-16.361,7.5) -16.108,9.19 ; -17.347,9.588 ccw(c-16.349,11.019) -16.108,9.291
  Top Layer w0.5: C11.1 ZQ1.2@-14.101,9.241
NetC15_2: C15.2 DD2.18 R4.1 SW2.1 | length 38.5
  Top Layer w0.25: v1(-1.473,13.725) -0.376,12.628 -0.376,8.166 DD2.18@-0.351,8.141
  Top Layer w0.4: C15.2 -15.755,28.055 -15.755,28.886 -15.391,29.25 -12.6,29.25 -4.4,29.25 -1.838,29.25 -1.5,28.912 R4.1 -0.348,28.05 0,27.702 v1(0,25.018)
  Bottom Layer w0.25: v1(-1.473,13.725) -1.473,15.988 -0.011,17.45 ; v1@-0.011,25.018 0,17.45
NetC16_2: C16.2 DD2.7 R6.1 SW3.1 XP4.3 | length 96.2
  Top Layer w0.25: v1(-12.066,10.655) -12.066,11.234 -11.359,11.941 DD2.7@-4.151,11.941 ; SW3.1@3.972,29.25 SW3.1@3.982,29.24
  Top Layer w0.4: C16.2 1.5,28.82 1.93,29.25 3.972,29.25 4.4,29.25 12.6,29.25 15.391,29.25 15.755,28.886 15.755,28.055 R6.1 ; v1(3.982,27.555) SW3.1@3.982,29.24
  Bottom Layer w0.25: v1(-12.066,10.655) -12.066,26.436 -10.947,27.555 v1(3.982,27.555) 3.982,22.615 4.313,22.284 13.386,22.284 14.885,20.784 14.885,15.025 16.012,13.898 22.681,13.898 23.988,15.205 27.392,15.205 27.722,14.875 27.722,14.013 XP4.3
NetC21_2: C21.2 DD3.20 | length 4.1
  Top Layer w0.25: DD3.20 8.75,-6.336 9.057,-6.028 C21.2
NetC22_2: C22.2 DD3.10 | length 8.9
  Top Layer w0.25: C22.2 3.159,-13.088 4.413,-13.088 5.05,-13.725 v1(5.05,-14.65) ; DD3.10 8.25,-14.4 v1@8.65,-14.8
  Bottom Layer w0.25: v1(5.05,-14.65) v1(8.65,-14.65)
NetDD1_1: DD1.1 DD1.2 XP2.6 | length 37.5
  Top Layer w0.4: XP2.6@-26.559,20.156 cw(c-25.571,18.761) -26.387,20.263 cw(c-25.571,18.761) -25.317,20.451 ; -19.739,-2.575 -19.737,-2.574 ; DD1.2@-18.2,-2.899 -19.412,-2.899 -19.736,-2.575 -19.737,-2.574 ; DD1.1@-18.2,-2.249 -19.412,-2.249 -19.737,-2.574
  Top Layer w0.5: XP2.6@-26.812,20.046 cw(c-25.813,18.615) -26.387,20.263 cw(c-25.813,18.615) -25.783,20.36 ; XP2.6@-26.812,20.954 ccw(c-25.813,22.385) -25.783,20.64
  Top Layer w0.8: XP2.6 -21.525,20.5 -21,19.975 -21,-2.141 -20.567,-2.574 -19.737,-2.574 ; -19.739,-2.575 -19.736,-2.575 -18.9,-2.575
NetDD1_5: DD1.5 DD1.6 XP2.1 | length 28.6
  Top Layer w0.4: DD1.6@-18.25,-5.499 -19.462,-5.499 -19.787,-5.174 -19.462,-4.849 DD1.5@-18.25,-4.849
  Top Layer w0.5: XP2.1@-26.812,10.046 cw(c-25.813,8.615) -25.783,10.36 ; XP2.1@-26.812,10.954 ccw(c-25.813,12.385) -25.783,10.64
  Top Layer w0.8: XP2.1 -23.108,10.5 -22.5,9.892 -22.5,-4.5 -21.826,-5.174 -19.787,-5.174 -19.355,-5.174 -19.356,-5.175 -18.9,-5.175
NetDD1_7: DD1.7 DD1.8 XP3.6 | length 20.3
  Top Layer w0.4: DD1.8@-18.225,-6.8 -19.437,-6.8 -19.762,-6.475 -19.437,-6.15 DD1.7@-18.225,-6.15
  Top Layer w0.5: XP3.6@-26.812,0.546 cw(c-25.813,-0.885) -25.783,0.86 ; XP3.6@-26.812,1.454 ccw(c-25.813,2.885) -25.783,1.14
  Top Layer w0.8: XP3.6 -24.55,1 -24,0.45 -24,-5.799 -23.325,-6.474 -19.787,-6.474 ; -19.762,-6.475 -19.33,-6.475 -19.331,-6.476 -18.925,-6.476
NetDD1_11: DD1.11 DD1.12 XP3.1 | length 13.2
  Top Layer w0.4: -19.787,-9.074 -19.462,-9.399 DD1.12@-18.25,-9.399 ; -19.714,-9 -19.462,-8.749 DD1.11@-18.25,-8.749
  Top Layer w0.5: XP3.1@-26.812,-9.454 cw(c-25.813,-10.885) -25.783,-9.14 ; XP3.1@-26.812,-8.546 ccw(c-25.813,-7.115) -25.783,-8.86
  Top Layer w0.8: XP3.1 -19.714,-9 ; -19.355,-9.074 -19.356,-9.075 -18.9,-9.075
NetDD1_15: DD1.15 DD2.11 | length 26.2
  Top Layer w0.25: DD1.15@-11,-8.099 -8.043,-8.099 v1@-7.667,-8.475 ; v1(-7.55,-1.6) -6.425,-0.475 -6.425,9.617 -6.1,9.941 DD2.11@-4.151,9.941
  Bottom Layer w0.25: v1(-7.55,-8.475) -7.515,-8.44 -6.846,-8.44 -6.399,-7.994 -6.399,-2.124 -6.903,-1.621 -7.529,-1.621 v1(-7.55,-1.6)
NetDD1_16: DD1.16 DD2.15 | length 22.6
  Top Layer w0.25: DD1.16@-11,-7.449 -6.649,-7.449 -4.1,-4.9 -4.1,-0.594 -3.606,-0.1 -2.449,-0.1 -1.851,0.498 DD2.15@-1.851,8.141
NetDD1_17: DD1.17 DD2.14 | length 21.9
  Top Layer w0.25: DD1.17@-11,-6.799 -6.964,-6.799 -4.78,-4.615 -4.78,6.024 -4.364,6.44 -2.672,6.44 -2.351,6.761 DD2.14@-2.351,8.141
NetDD1_21: DD1.21 DD2.12 | length 20.5
  Top Layer w0.25: DD1.21 -6.399,-4.199 -5.9,-3.7 -5.9,9.082 -5.541,9.441 DD2.12@-4.151,9.441
NetDD1_22: DD1.22 DD2.13 | length 22.9
  Top Layer w0.25: DD1.22@-11,-3.549 -8.021,-3.549 -7.723,-3.25 v1(-7.55,-3.25) ; v1@-7.3,-5.525 -6.699,-5.525 -5.36,-4.186 -5.36,7.612 -4.831,8.141 DD2.13@-2.851,8.141
  Bottom Layer w0.25: v1(-7.55,-5.525) v1(-7.55,-3.25)
NetDD1_23: DD1.23 DD2.10 | length 18.1
  Top Layer w0.25: DD1.23@-11,-2.899 -10.24,-2.899 -7,0.342 -7,10.063 -6.621,10.441 DD2.10@-4.151,10.441
NetDD2_16: DD2.16 XP2.3 | length 45.7
  Top Layer w0.25: DD2.16@-1.351,8.141 DD2.16 -1.351,3.95 v1@0.149,2.45
  Bottom Layer w0.25: XP2.3 -25.779,14.5 -25.077,15.202 -24.042,15.202 -23.775,14.934 -23.775,3.511 -23.143,2.879 -1.058,2.879 -0.629,2.45 v1(0.075,2.45)
NetDD2_17: DD2.17 XP2.4 | length 44
  Top Layer w0.25: DD2.17@-0.851,8.141 -0.851,4.772 -0.032,3.952 v1(0.075,3.952) v1@0.067,3.955
  Bottom Layer w0.25: XP2.4 -26.974,16.474 -25.726,16.474 -25.1,15.847 -23.766,15.847 -23.225,15.306 -23.225,3.969 -22.727,3.47 -1.109,3.47 -0.629,3.95 v1@0.075,3.95
NetDD2_20: DD2.20 R3.1 | length 9.6
  Top Layer w0.25: R3.1@-3.076,4.241 -3.076,5.524 v1@-3.05,5.55 ; v1@0.25,5.475 0.075,5.65 0.075,6.2 0.649,6.774 DD2.20@0.649,8.141
  Top Layer w0.8: R3.1@-3.422,4.52 ccw(c-4.82,5.563) v1(-3.076,5.55) ccw(c-1.367,5.507) R3.1@-2.754,4.507
  Bottom Layer w0.25: v1@-3.05,5.55 v1(0.075,5.55)
NetDD2_25: DD2.25 XP5.5 | length 29.6
  Top Layer w0.25: DD2.25@3.949,9.441 3.949,7.175 4.406,6.718 11.574,6.718 11.981,7.125 11.981,9.548 12.473,10.041 v4@18.689,10.041
  Bottom Layer w0.25: v4@18.623,9.96 27.518,9.96 27.804,9.674 XP5.5@27.804,9.351
  other v4: 18.818,10.041
NetDD2_29: DD2.29 XP3.3 | length 61.1
  Top Layer w0.25: DD2.29@3.949,11.441 DD2.29 5.615,11.441 6.056,11 9.949,11 10.292,11.343 10.292,11.873 v1(10.325,11.906)
  Bottom Layer w0.25: XP3.3@-26.993,-5.065 -25.771,-5.065 -25.07,-4.364 -23.593,-4.364 -23.225,-3.995 -23.225,1.16 -22.867,1.517 -7.935,1.517 -5.867,-0.55 0.459,-0.55 3.029,2.019 8.585,2.019 9.866,3.3 9.866,10.742 10.325,11.202 v1(10.325,11.906)
NetDD2_30: DD2.30 XP3.4 | length 57.6
  Top Layer w0.25: DD2.30@3.949,11.941 v1@8.825,11.941
  Bottom Layer w0.25: XP3.4@-26.966,-3.092 -25.719,-3.092 -25.093,-3.718 -24.109,-3.718 -23.775,-3.384 -23.775,1.671 -23.288,2.157 -7.619,2.157 -5.516,0.055 0.146,0.055 2.677,2.586 8.283,2.586 9.305,3.607 9.305,10.722 8.825,11.202 v1(8.825,11.906)
NetDD2_32: DD2.32 R5.1 | length 32
  Top Layer w0.25: DD2.32@3.949,12.941 14.382,12.941 16.675,15.234 v1(18.818,15.234)
  Top Layer w0.4: R5.1 19,24.839 19.395,24.444 21.725,24.444 22.1,24.069 v1(22.1,17.95)
  Bottom Layer w0.25: v1(18.818,15.234) 21.387,15.234 22.1,15.947 v1(22.1,17.95)
NetDD2_34: DD2.34 XP4.6 | length 27.7
  Top Layer w0.25: DD2.34@3.949,13.941 3.958,13.932 5.433,13.932 5.94,13.425 13.949,13.425 16.438,15.913 v1(16.438,18.525)
  Bottom Layer w0.25: v1(16.438,18.525) 17.142,18.525 17.621,19.005 24.64,19.005 25.23,18.416 25.23,17.005 XP4.6@25.73,16.505
NetDD2_37: DD2.37 XP4.5 | length 31.2
  Top Layer w0.25: v1@2.635,18.35 2.649,18.336 DD2.37@2.649,16.241 ; v1(9.56,20.025) v1(16.426,20.025)
  Bottom Layer w0.25: v1(2.635,18.45) 2.635,19.232 3.423,20.02 v1@9.227,20.02 ; v1@16.438,20.025 17.142,20.025 17.601,19.566 27.236,19.566 27.775,19.027 27.775,17 XP4.5@28.27,16.505
NetDD2_44: DD2.44 R2.1 | length 16.9
  Top Layer w0.25: DD2.44 -0.851,14.839 0.333,13.654 0.821,13.654 v1(0.875,13.6) ; v1(6.125,7.875) 6.125,8.725 6.617,9.216 R2.1@7.849,9.216
  Bottom Layer w0.25: v1(0.875,13.6) 2.907,13.6 3.35,13.157 3.35,8.473 3.948,7.875 v1(6.125,7.875)
NetDD3_9: DD3.9 R9.2 | length 5.1
  Top Layer w0.25: DD3.9 7.75,-15.625 8,-15.875 9.921,-15.875 R9.2@9.975,-15.928
NetR1_2: R1.2 VD1.1 | length 7.7
  Top Layer w0.4: VD1.1@-21.637,27.728 cw(c-20.59,26.377) -20.481,28.082 ; VD1.1@-21.625,28.463 ccw(c-20.573,29.855) -20.332,28.127 ; -20.019,28.101 ccw(c-19.765,29.791) -20.015,28.1 ccw(c-19.765,29.791) -19.516,28.1 ccw(c-19.765,29.791) R1.2@-18.778,28.396 ; -19.928,28.057 cw(c-19.77,26.32) R1.2@-18.718,27.711
  Top Layer w0.5: -21.5,28.1 -20.015,28.1 -19.516,28.1 -19.05,28.1 R1.2
NetR5_2: R5.2 VD2.1 | length 7.9
  Top Layer w0.25: R5.2 R5.2@19.208,28.05
  Top Layer w0.4: R5.2@18.668,27.711 cw(c19.72,26.32) 19.877,28.057 ; R5.2@18.727,28.396 ccw(c19.715,29.791) 19.464,28.1 ccw(c19.715,29.791) 19.965,28.1 ccw(c19.715,29.791) 19.968,28.1 ; 20.243,28.056 cw(c20.497,26.366) VD2.1@21.544,27.717 ; 20.243,28.157 ccw(c20.484,29.885) VD2.1@21.537,28.493
  Top Layer w0.5: R5.2@19.208,28.05 19.258,28.1 19.464,28.1 19.965,28.1 21.5,28.1
NetSW1_2: SW1.2 XP1.1 | length 12.4
  Top Layer w0.8: XP1.1 -18.981,-20.5 -18,-21.481 SW1.2
RX: DD2.22 XP5.6 | length 71.5
  Top Layer w0.25: DD2.22@1.649,8.141 1.649,10.749 v1(1.675,10.775)
  Bottom Layer w0.25: v1@1.69,10.77 0.986,10.77 0.57,11.187 -3.641,11.187 -4.645,12.191 -4.645,26.34 -4.113,26.872 2.608,26.872 3.234,26.246 3.234,22.285 3.948,21.571 13.071,21.571 14.263,20.379 14.263,8.917 15.15,8.03 23.383,8.03 24.238,8.885 XP5.6 XP5.6@25.73,8.885
SCL: DD2.42 DD3.23 R8.1 XP6.3 | length 93.3
  Top Layer w0.25: DD2.42@0.149,16.241 0.149,19.34 0.888,20.079 R8.1 4.291,20.079 4.807,19.563 v1(4.807,18.45) ; DD3.23 7.25,-6.864 8.29,-5.824 8.29,-1.84 8.678,-1.453 v1(8.678,-1.419)
  Bottom Layer w0.25: v1(4.807,18.45) 4.807,17.746 5.287,17.266 5.287,15.225 6.226,14.286 11.037,14.286 11.876,13.447 11.876,-3.193 11.02,-4.049 8.662,-4.049 8.236,-3.623 8.236,-2.537 8.678,-2.095 v1(8.678,-1.419) 8.678,-0.743 8.224,-0.289 8.224,0.735 7.715,1.244 5.269,1.244 4.542,0.517 4.542,-9.477 5.63,-10.565 21.735,-10.565 23.815,-12.645 27.187,-12.645 27.65,-12.182 XP6.3@27.65,-11.555
SDA: DD2.43 DD3.24 R7.1 XP6.4 | length 97.5
  Top Layer w0.25: DD2.43@-0.351,16.241 DD2.43 -0.351,20.339 0.384,21.075 5.925,21.075 6.307,20.693 v1@6.307,18.793 ; DD3.24 6.3,-9.053 5.975,-8.728 5.975,-6.028 6.001,-6.002 7.138,-6.002 7.534,-5.606 7.534,-1.855 v1(7.098,-1.419)
  Bottom Layer w0.25: v1(6.307,18.45) 6.307,17.746 5.848,17.286 5.848,15.532 6.479,14.9 11.291,14.9 12.466,13.724 12.466,-3.533 11.399,-4.6 8.351,-4.6 7.551,-3.801 7.551,-2.549 7.098,-2.095 v1(7.098,-1.419) 7.098,-0.65 7.54,-0.209 7.54,0.33 7.187,0.682 5.66,0.682 5.174,0.197 5.174,-9.13 5.935,-9.891 21.609,-9.891 23.815,-7.685 27.187,-7.685 27.65,-8.148 27.65,-8.775 XP6.4
TX: DD2.21 XP5.4 | length 72.7
  Top Layer w0.25: 0.653,9.95 0.653,11.808 1.12,12.275 v1(1.675,12.275) ; 0.675,11.675 0.675,9.941 1.149,9.467 DD2.21@1.149,8.141
  Bottom Layer w0.25: v1@1.69,12.27 0.986,12.27 0.587,11.872 -3.059,11.872 -3.961,12.773 -3.961,25.807 -3.469,26.299 1.932,26.299 2.461,25.77 2.461,21.905 3.469,20.897 12.762,20.897 13.588,20.072 13.588,8.483 14.749,7.321 23.325,7.321 24.26,6.386 XP5.4@25.178,6.386
pads on no net: C2.0 C7.0 C14.0 DA1.0 DD2.2 DD2.3 DD2.4 DD2.19 DD2.26 DD2.27 DD2.28 DD2.31 DD2.33 DD2.38 DD2.39 DD2.40 DD2.45 DD2.46 DD3.2 DD3.3 DD3.4 DD3.5 DD3.6 DD3.7 DD3.14 DD3.15 DD3.16 DD3.17 DD3.19 DD3.21 DD3.22 DD3.25 SW1.1 SW1.4 SW1.5 SW1.6 XP6.5 XP6.6 XP6.7 XP6.9 XP6.10 XP6.11 XP6.12 XP6.13 XP6.14 XP6.15 XP6.16
copper on no net:
  other v2: -27.511,-30.849 -27.511,-30.849 27.5,-30.75 27.5,-30.75 -28.781,-30.369 -26.241,-30.369 26.23,-30.27 28.77,-30.27 -29.261,-29.099 -29.261,-29.099 -25.761,-29.099 -25.761,-29.099 25.75,-29 25.75,-29 29.25,-29 29.25,-29 -28.781,-27.829 -26.241,-27.829 26.23,-27.73 28.77,-27.73 -27.511,-27.349 -27.511,-27.349 27.5,-27.25 27.5,-27.25 -27.5,27.25 -27.5,27.25 27.574,27.263 27.574,27.263 -28.77,27.73 -26.23,27.73 26.304,27.743 28.844,27.743 -29.25,29 -29.25,29 -25.75,29 -25.75,29 25.824,29.013 25.824,29.013 29.324,29.013 29.324,29.013 -28.77,30.27 -26.23,30.27 26.304,30.283 28.844,30.283 -27.5,30.75 -27.5,30.75 27.574,30.763 27.574,30.763

## Polygon pours and split planes (outlines as drawn)
no net on Top Layer "Top Layer-No Net" (solid, pour order 28): -1.916,-9.459 -1.916,-4.987 -1.953,-4.95 -1.456,-4.453 4.767,-4.453 9.499,-4.453 9.499,-9.489
no net on Top Layer "Top Layer-No Net 1" (solid, pour order 26): -13.354,-4.455 -13.354,-0.875 -13.354,2.346 -7.743,2.346 -5.478,2.346 -5.478,-4.455 -10.392,-4.455
no net on Top Layer "Top Layer-No Net 2" (solid, pour order 24): -3.861,22.916 3.679,22.916 7.443,22.916 7.443,15.279 7.381,15.217 -3.861,15.376
GND on Top Layer "GND" (solid, remove dead copper, pour order 2): -29.469,33.012 29.231,33.012 cw(c29.231,30.712) 31.531,30.712 31.531,-30.788 cw(c29.251,-30.788) 29.251,-33.068 -29.589,-33.068 cw(c-29.589,-31.092) -31.565,-31.092 -31.565,30.916 cw(c-29.469,30.916)
GND on Bottom Layer "GND" (solid, remove dead copper, pour order 4): -29.434,33.005 29.266,33.005 cw(c29.266,30.705) 31.566,30.705 31.566,-30.795 cw(c29.286,-30.795) 29.286,-33.075 -29.554,-33.075 cw(c-29.554,-31.099) -31.53,-31.099 -31.53,30.909 cw(c-29.434,30.909)
no net on Bottom Overlay "GND" (solid, pour order 30): -29.397,32.977 29.303,32.977 cw(c29.303,30.677) 31.603,30.677 31.603,-30.823 cw(c29.323,-30.823) 29.323,-33.103 -29.517,-33.103 cw(c-29.517,-31.127) -31.493,-31.127 -31.493,30.881 cw(c-29.397,30.881)

## Other copper
Top Layer:
  pour cut-out: -2.325,22.048 -2.325,19.65 -1.547,19.65 -1.547,22.048
  pour cut-out: 4.82,15.264 4.82,8.964 3.17,8.964 3.17,7.264 -3.18,7.264 -3.18,9.089 -5.005,9.089 -5.005,15.466 -3.391,15.466 -3.391,17.089 3.018,17.089 3.022,15.264
  pour cut-out: 2.3,6.35 2.3,1.297 -2,1.297 -2,6.35
  pour cut-out: -10.195,-4.57 -5.7,-4.57 -5.7,-6.5 -10.195,-6.5
  pour cut-out: -3.85,20.65
  pour cut-out: -4.8,5.925 -4.35,6.375 -2,6.375 -2,0.443 -2.343,0.1 -4.722,0.1

## Silkscreen, mask and mechanical layers (free items; w line width, h text height)
Top Overlay:
  drawing of 2059 lines, arcs and shapes, not listed
  text "M1" at -24.508,19.957 h1
  text "3.3v" at -24.508,18.103 h1
  text "C1" at -24.508,16.103 h1
  text "SWDIO" at 20.446,16.037 h0.8
  text "CLK" at 29.319,16.037 h0.8
  text "C2" at -24.508,14.103 h1
  text "3.3v" at 21.437,13.412 h0.8
  text "RST" at 29.319,13.404 h0.8
  text "GND" at -24.508,12.103 h1
  text "6v" at 29.659,10.888 h0.8
  text "GND" at 21.528,10.88 h0.8
  text "M2" at -24.508,10.103 h1
  text "PB11" at 21.368,8.491 h0.8
  text "B12" at 29.377,8.479 h0.8
  text "PB10" at 21.025,5.993 h0.8
  text "GND" at 29.319,5.993 h0.8
  text "3.3v" at 21.437,3.369 h0.8
  text "6v" at 29.733,3.361 h0.8
  text "NC" at 22.244,0.829 h0.8
  text "INT" at 29.561,0.829 h0.8
  text "M1" at -24.508,0.457 h1
  text "3.3v" at -24.508,-1.397 h1
  text "NC" at 22.244,-1.711 h0.8
  text "NC" at 29.561,-1.711 h0.8
  text "C1" at -24.508,-3.397 h1
  text "NC" at 22.244,-4.251 h0.8
  text "NC" at 29.561,-4.251 h0.8
  text "C2" at -24.508,-5.397 h1
  text "NC" at 22.244,-6.739 h0.8
  text "NC" at 29.561,-6.739 h0.8
  text "GND" at -24.508,-7.397 h1
  text "NC" at 22.244,-9.279 h0.8
  text "SDA" at 29.319,-9.279 h0.8
  text "M2" at -24.508,-9.397 h1
  text "NC" at 22.244,-11.819 h0.8
  text "SLC" at 29.319,-11.819 h0.8
  text "NC" at 22.244,-14.359 h0.8
  text "GND" at 29.319,-14.359 h0.8
  text "NC" at 22.244,-16.899 h0.8
  text "3.3v" at 29.319,-16.899 h0.8
  text "GND" at -24.508,-19.03 h1
  text "VDD" at -24.508,-21.175 h1
Bottom Overlay:
  drawing of 1166 lines, arcs and shapes, not listed
Mechanical 1:
  the board outline again, w0.5

## Text inside footprints (layer, text, board x,y; h text height)
C2: Top Overlay "+" at -11.958,0.505 h0.5 r180